# Altium PCB extension.PcbDoc (part 3 of 3)
Units mil, origin at the board's own origin, x right, y up, seen from the top; angles counter-clockwise.
Board outline 6141.73 x 4724.41 mil, 4 copper layers (Top Copper, Supply, GND, Bot Copper), stack 61.417 mil thick; 231 components, 147 nets, 660 pads, 234 vias.
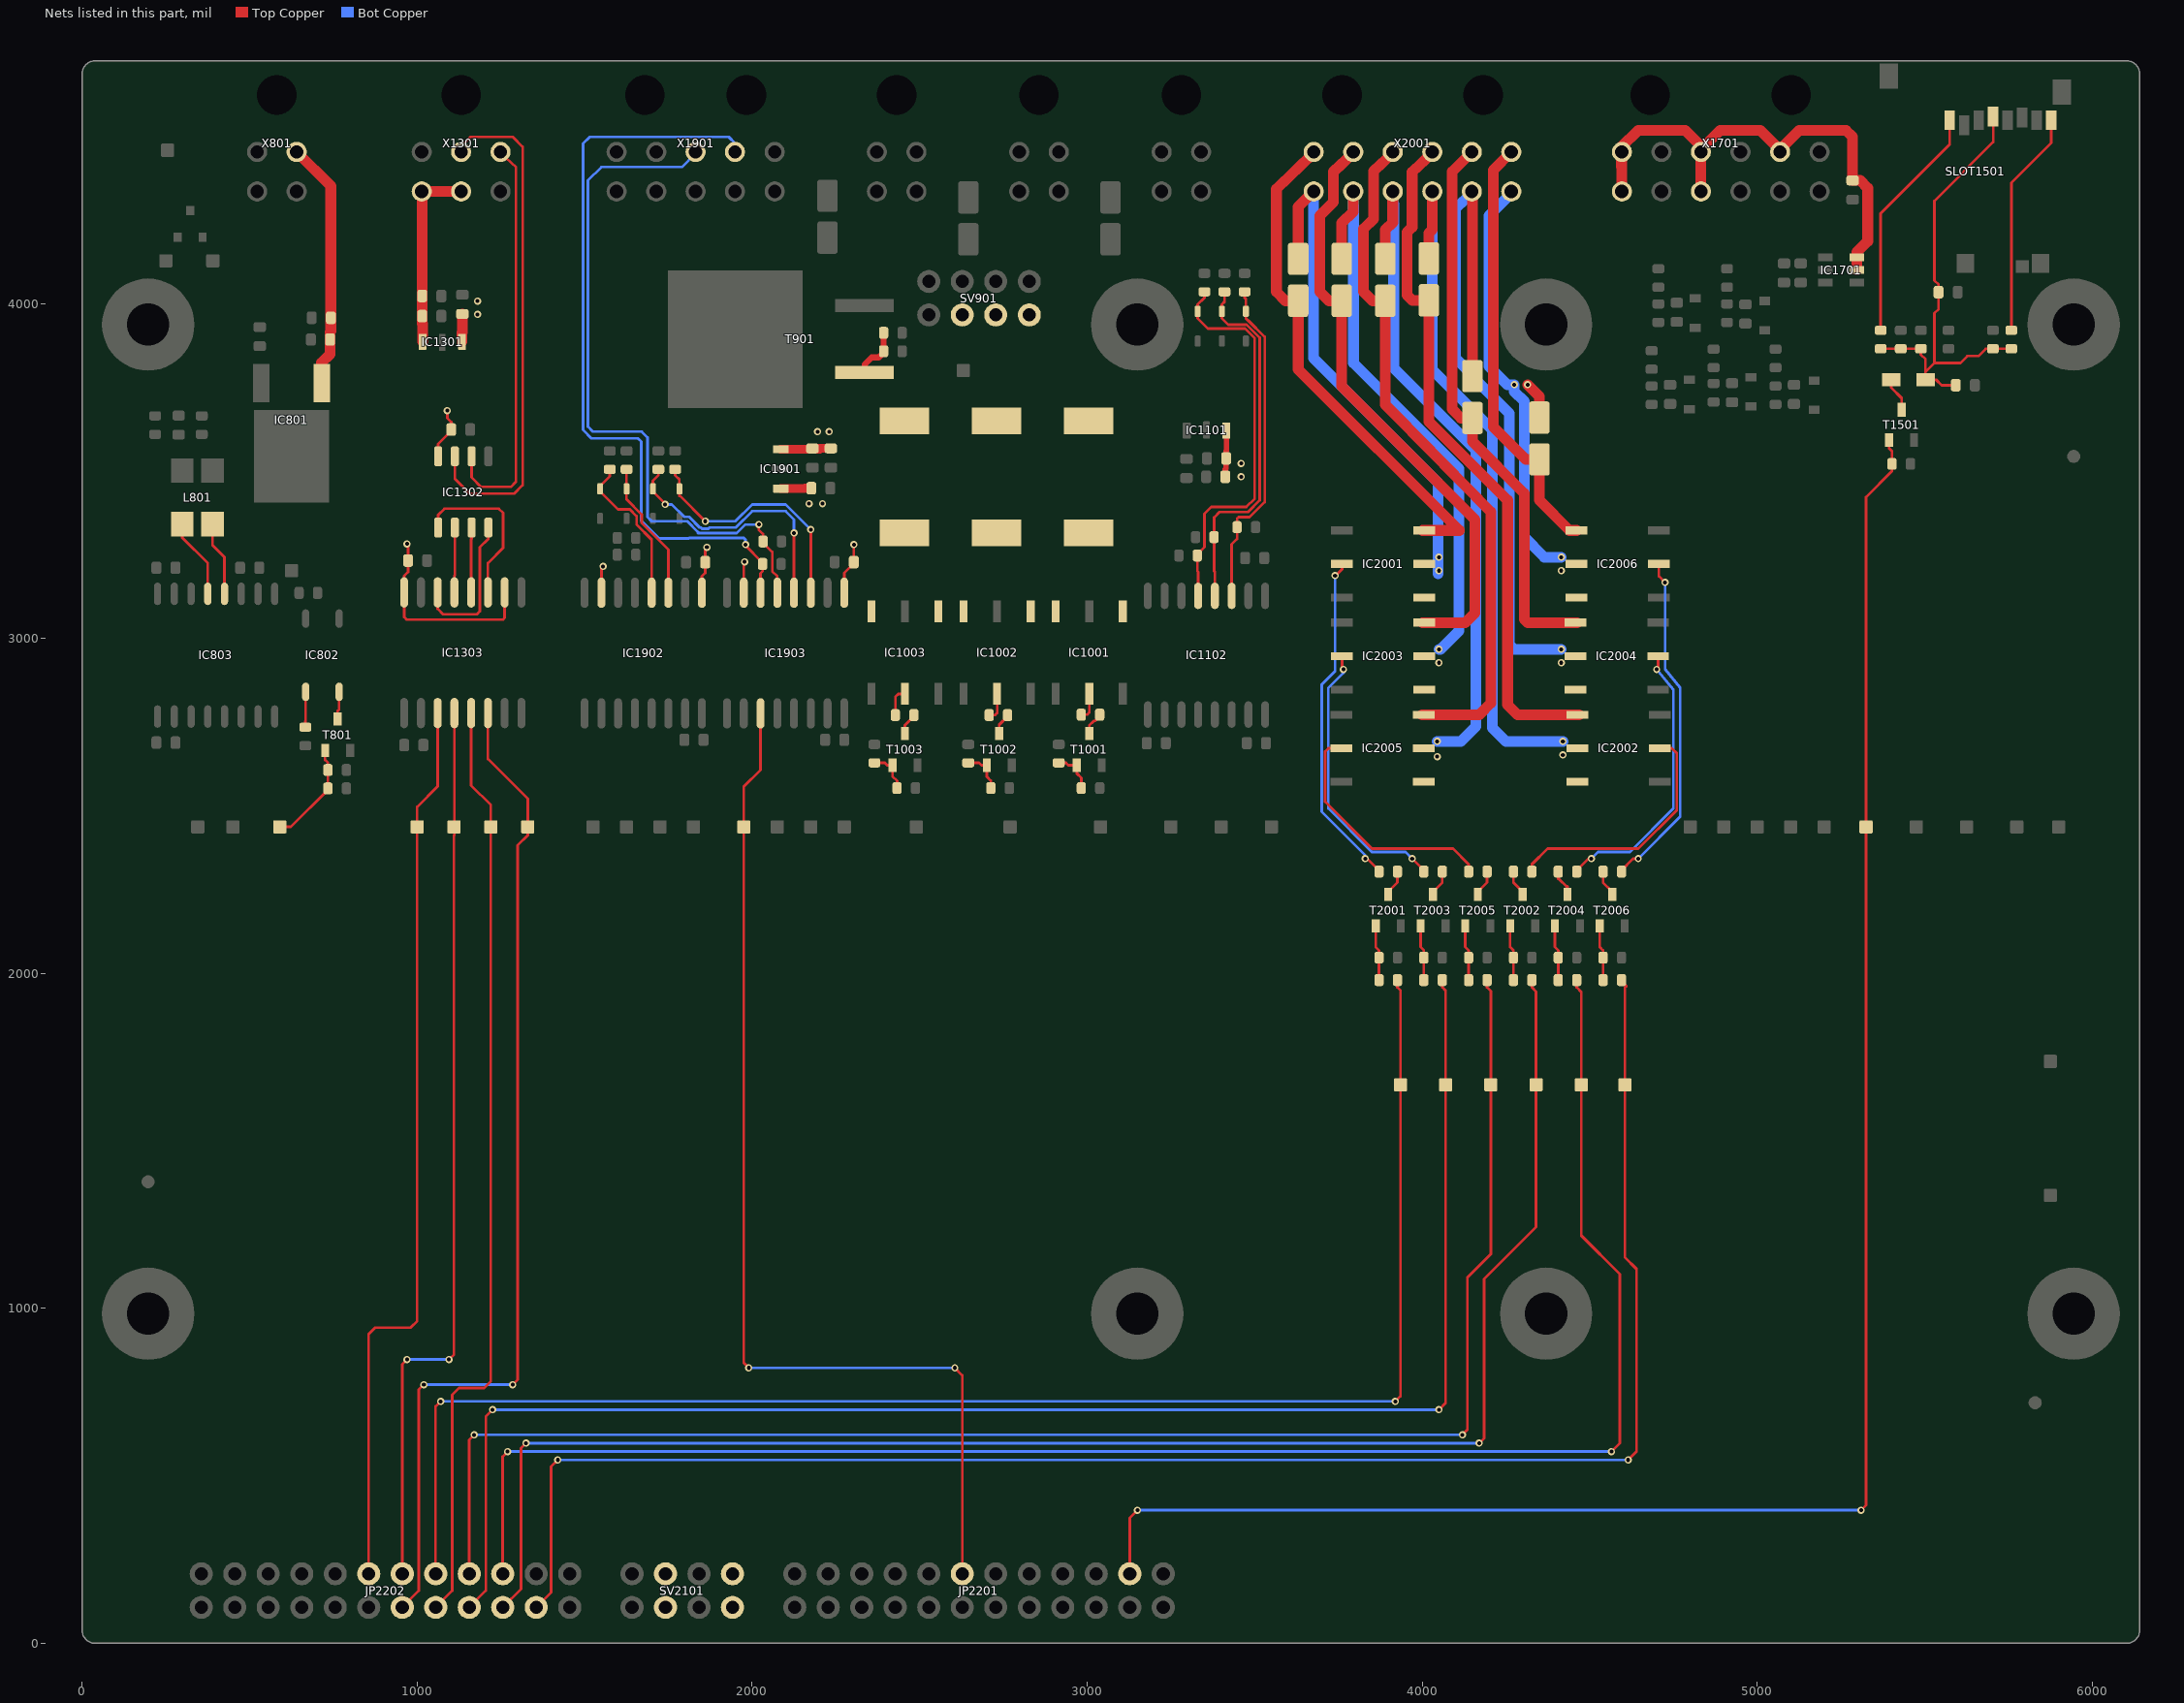
[diagram p5: the nets of this part, all layers, seen from the top]

## Via types
v1: diameter 21.65, hole 11.81, Top Copper to Bot Copper, tented both sides, 231 vias
v2: diameter 17.72, hole 8, Top Copper to Bot Copper, 2 vias
v3: diameter 35.43/70.86/70.86/35.43 (per signal layer), hole 23.62, Top Copper to Bot Copper, 1 vias

## Nets (pads, with @x,y where several pads share a name; then routed paths per layer and width w, separated by ;. In a path a pad name is that pad's centre, name@x,y a point inside that pad or via, vN(x,y) a via of type N, cw(c..) or ccw(c..) an arc to the next point about the centre after c; other vN are vias at no path point) (continued)
ISO_GPIO_MCU_0_OUT_2_EXT: IC1903.5 R1907.2 X1901.3 | length 2110.8
  Top Copper w8: v1(2020,3340) 2020,3323.65 2032.44,3311.21 R1907.2@2032.44,3289.5 2032.44,3285.56 2060,3258 2060,3200.54 2075,3185.54 IC1903.5@2075,3136.27
  Bot Copper w8: X1901.3@1831.26,4449.17 1831.26,4448.66 1790,4407.4 1550,4407.4 1510,4367.4 1510,3632.4 1525,3617.4 1670,3617.4 1687.5,3599.9 1687.5,3362.4 1700,3349.9 1806.25,3349.9 1838.22,3317.93 1838.22,3314.19 1954.19,3314.19 1980,3340 v1(2020,3340)
ISO_GPIO_MCU_0_OUT_3: IC1903.11 JP2201.14 LSP1908.1 | length 3221.4
  Top Copper w8: v1(1990,822.4) 1975,837.4 LSP1908.1@1975,2437.4 1975,2557.4 2025,2607.4 IC1903.11@2025,2776.03 ; IC1903.11@2025,2777.9 IC1903.11@2026.26,2776.64 ; v1(2605,822.4) 2627.17,800.23 JP2201.14@2627.17,207.48
  Bot Copper w8: v1(1990,822.4) v1(2605,822.4)
ISO_GPIO_MCU_0_OUT_3_EXT: IC1903.6 R1908.2 X1901.4 | length 2297.2
  Top Copper w8: v1(1980,3280) 1980,3277.52 2031.18,3226.34 R1908.2@2031.18,3222.4 2031.18,3200.68 2025,3194.5 IC1903.6@2025,3136.27
  Bot Copper w8: X1901.4@1949.37,4449.17 1949.37,4478.03 1930,4497.4 1515,4497.4 1495,4477.4 1495,3622.4 1520,3597.4 1658.75,3597.4 1668.75,3587.4 1668.75,3351.25 1721.68,3298.32 1810.71,3298.32 1812.28,3299.9 1975,3299.9 1980,3294.9 v1(1980,3280)
ISO_GPIO_SUPPLY: C1903.1 C1904.1 C1906.1 IC1901.1 IC1902.1 IC1902.7 IC1903.1 IC1903.7 | length 565.4
  Top Copper w8: IC1902.7@1550,3136.27 1550,3210 v1(1555,3215) ; IC1902.1@1850,3136.27 1850,3185.54 1859.8,3195.35 C1903.1@1859.8,3227.4 1859.8,3267.2 v1(1865,3272.4) ; IC1903.7@1975,3134.4 IC1903.7@1975,3136.27 1975,3226.15 v1(1977.5,3228.65) ; IC1903.1@2275,3136.27 2275,3195.52 2303.54,3224.06 C1906.1@2303.54,3228 v1(2303.54,3280)
  Top Copper w26: IC1901.1@2085.68,3447.09 2156.13,3447.09 2157.69,3448.66 C1904.1@2176.46,3448.66
  other v1: 2170,3402.4 2210,3402.4
ISONOC_0_CONTROL: JP2202.10 LSP2001.1 R2001.2 | length 4638.8
  Top Copper w8: JP2202.10@1055.51,207.48 1055,207.99 1055,707.4 v1(1070,722.4) ; v1(3920,722.4) 3935,737.4 LSP2001.1@3935,1667.4 3935,1949.58 3926.3,1958.28 R2001.2@3926.3,1980
  Bot Copper w8: v1(1070,722.4) v1(3920,722.4)
ISONOC_0_NEGATIVE: D2001.2 IC2001.5 X2001.7 | length 1521.5
  Top Copper w32: D2001.2@3630,4133.15 3630,4288.15 X2001.7@3676.26,4334.41
  Bot Copper w32: X2001.7@3675.98,4327.12 3675,4333.23 3675,3837.4 4046.85,3465.55 v1@4046.85,3192.4
  other v1: 4050,3202.4 4050,3242.4
ISONOC_0_POSITIVE: D2001.1 IC2001.4 IC2001.6 X2001.1 | length 1532.2
  Top Copper w32: X2001.1@3675.98,4449.17 3565,4341.34 3565,4035 3591.85,4008.15 D2001.1@3630,4008.15 3630,3804 4111.6,3322.4 IC2001.6@4006.77,3322.4 IC2001.6@4001.85,3322.4
ISONOC_1_CONTROL: JP2202.7 LSP2003.1 R2007.2 | length 4738.7
  Top Copper w8: JP2202.7@1155.51,107.48 1205,156.97 1205,677.4 v1(1225,697.4) ; v1(4050,697.4) 4070,717.4 LSP2003.1@4070,1667.4 4070,1948.33 4060.05,1958.28 R2007.2@4060.05,1980
  Bot Copper w8: v1(1225,697.4) v1(4050,697.4)
ISONOC_1_NEGATIVE: D2003.2 IC2003.5 X2001.8 | length 1733.8
  Top Copper w32: D2003.2@3760,4133.15 3760,4240 3794.25,4274.25 X2001.8@3794.25,4334.41
  Bot Copper w32: X2001.8@3794.09,4327.12 3794.09,4293.31 3795,4292.4 3795,3822.4 4110,3507.4 4110,3022.4 4055,2967.4 v1(4050,2967.4)
  other v1: 4050,2927.4
ISONOC_1_POSITIVE: D2003.1 IC2003.4 IC2003.6 X2001.2 | length 1796.2
  Top Copper w32: X2001.2@3794.09,4449.17 3735,4393.23 3735,4302.4 3695,4262.4 3695,4035 3721.85,4008.15 D2003.1@3760,4008.15 3760,3752.4 4157,3355.4 4157,3075.4 4129,3047.4 IC2003.6@4006.77,3047.4 IC2003.6@4001.85,3047.4
ISONOC_2_CONTROL: JP2202.8 LSP2005.1 R2013.2 | length 4768.8
  Top Copper w8: JP2202.8@1155.51,207.48 1155,207.99 1155,607.4 v1(1170,622.4) ; v1(4120,622.4) 4135,637.4 4135,1092.4 4205,1162.4 LSP2005.1@4205,1667.4 4205,1947.08 4193.8,1958.28 R2013.2@4193.8,1980
  Bot Copper w8: v1(1170,622.4) v1(4120,622.4)
ISONOC_2_NEGATIVE: D2005.2 IC2005.5 X2001.9 | length 2036.5
  Top Copper w32: D2005.2@3890,4133.15 3890,4220 3912.24,4242.24 X2001.9@3912.24,4334.41
  Bot Copper w32: X2001.9@3912.2,4327.12 3912.2,4300.2 3915,4297.4 3915,3807.4 4160,3562.4 4160,2737.4 4115,2692.4 v1(4045,2692.4)
  other v1: 4045,2647.4
ISONOC_2_POSITIVE: D2005.1 IC2005.4 IC2005.6 X2001.3 | length 2077.3
  Top Copper w32: X2001.3@3912.2,4449.17 3855,4395.12 3855,4252.4 3825,4222.4 3825,4035 3851.85,4008.15 D2005.1@3890,4008.15 3890,3697.4 3920,3667.4 4205,3377.4 4205,2807.4 4170,2772.4 IC2005.6@4004.29,2772.4 IC2005.6@3999.37,2772.4
ISONOC_3_CONTROL: JP2202.5 LSP2002.1 R2002.2 | length 4821.9
  Top Copper w8: JP2202.5@1255.51,107.48 1310,161.97 1310,582.4 v1(1325,597.4) ; v1(4170,597.4) 4185,612.4 4185,1087.4 4340,1242.4 LSP2002.1@4340,1667.4 4340,1945.83 4327.55,1958.28 R2002.2@4327.55,1980
  Bot Copper w8: v1(1325,597.4) v1(4170,597.4)
ISONOC_3_NEGATIVE: D2002.2 IC2002.5 X2001.10 | length 2100.2
  Top Copper w32: D2002.2@4020,4134.41 4020,4210 4030.28,4220.28 X2001.10@4030.28,4334.41
  Bot Copper w32: X2001.10@4030.32,4327.12 4030.32,4297.72 4030,4297.4 4030,3802.4 4210,3622.4 4210,2732.4 4250,2692.4 v1(4420,2692.4)
  other v1: 4420,2652.4
ISONOC_3_POSITIVE: D2002.1 IC2002.4 IC2002.6 X2001.4 | length 2057.7
  Top Copper w32: X2001.4@4030.32,4449.17 3970,4392.01 3970,4227.4 3955,4212.4 3955,4025 3970.59,4009.41 D2002.1@4020,4009.41 4020,3647.4 4255,3412.4 4255,2802.4 4285,2772.4 IC2002.4@4463.23,2772.4 IC2002.4@4468.15,2772.4
ISONOC_4_CONTROL: JP2202.6 LSP2004.1 R2008.2 | length 5137.6
  Top Copper w8: JP2202.6@1255.51,207.48 1255,207.99 1255,557.4 v1(1270,572.4) ; R2008.2@4461.3,1980 4461.3,1958.28 4475,1944.58 LSP2004.1@4475,1667.4 4475,1217.4 4590,1102.4 4590,597.4 v1(4565,572.4)
  Bot Copper w8: v1(1270,572.4) v1(4565,572.4)
ISONOC_4_NEGATIVE: D2004.2 IC2004.5 X2001.11 | length 2146.5
  Top Copper w32: X2001.11@4148.27,4334.41 4150,4332.68 D2004.2@4150,3783.15
  Bot Copper w32: X2001.11@4148.43,4327.12 4100,4285.79 4100,3837.4 4145,3792.4 4145,3787.4 4260,3672.4 4260,2982.4 4275,2967.4 v1(4415,2967.4)
  other v1: 4415,2927.4
ISONOC_4_POSITIVE: D2004.1 IC2004.4 IC2004.6 X2001.5 | length 1691.4
  Top Copper w32: X2001.5@4148.27,4452.4 4089,4393.13 4089,3684.64 4115.49,3658.15 D2004.1@4150,3658.15 ; D2004.1@4148.31,3657.99 4150,3640.43 4150,3587.4 4305,3432.4 4305,3057.4 4315,3047.4 IC2004.4@4458.23,3047.4 IC2004.4@4463.15,3047.4
ISONOC_5_CONTROL: JP2202.3 LSP2006.1 R2014.2 | length 5127.1
  Top Copper w8: JP2202.3@1355.51,107.48 1400,151.97 1400,527.4 v1(1420,547.4) ; R2014.2@4595.05,1980 4595.05,1976.06 4609.64,1961.47 4605,1956.83 LSP2006.1@4605,1667.4 4605,1152.4 4640,1117.4 4640,572.4 v1(4615,547.4)
  Bot Copper w8: v1(1420,547.4) v1(4615,547.4)
ISONOC_5_NEGATIVE: D2006.2 IC2006.5 X2001.12 | length 1339.8
  Top Copper w32: v1(4315,3757.4) 4350,3722.4 D2006.2@4350,3678.11
  Bot Copper w32: X2001.12@4266.54,4327.12 4266.54,4328.94 4200,4262.4 4200,3812.4 4255,3757.4 v1(4275,3757.4) 4275,3737.4 4305,3707.4 4305,3302.4 4365,3242.4 v1(4415,3242.4)
  other v1: 4415,3202.4
ISONOC_5_POSITIVE: D2006.1 IC2006.4 IC2006.6 X2001.6 | length 1291.3
  Top Copper w32: X2001.6@4266.26,4452.4 4212,4398.14 4212,3632 4309.59,3534.41 D2006.1@4350,3534.41 4350,3412.44 4440.04,3322.4 IC2006.4@4460.71,3322.4
MCU_TO_FPGA_INTERFACE_MCU_0_CS: SV2101.2
MCU_TO_FPGA_INTERFACE_MCU_0_MISO: SV2101.5
MCU_TO_FPGA_INTERFACE_MCU_0_MOSI: SV2101.1
MCU_TO_FPGA_INTERFACE_MCU_0_SCK: SV2101.6
Memorycard_SUPPLY: C1501.2 C1502.1 L1501.1 R1502.2 R1503.2 R1504.2 R1506.2 R1507.2 SLOT1501.4 | length 1418.5
  Top Copper w8: R1502.2@5368.74,3864.84 R1506.2@5428.74,3864.84 R1504.2@5488.74,3864.84 5488.74,3847.06 5502.44,3833.36 5502.44,3796.09 ; C1502.1@5592.91,3756 5550.4,3756 5534,3772.4 L1501.1@5502.44,3772.4 5502.44,3796.09 ; SLOT1501.4@5704.54,4558 5704.54,4481.54 5529,4306 5529,4068.82 5541.46,4056.36 C1501.2@5541.46,4033.66 5541.46,3983.46 5529,3971 5529,3822.64 ; R1503.2@5758.74,3864.84 R1507.2@5703.74,3864.84 5682.02,3864.84 5660.24,3843.06 5627.06,3843.06 5606.64,3822.64 5529,3822.64 ; 5502.44,3796.09 5529,3822.64
Memorycard_SUPPLY_CONTROL: JP2201.4 LSP1501.1 R1501.1 T1501.1 | length 5595.9
  Top Copper w8: JP2201.4@3127.17,207.48 3127.17,374.57 v1(3150,397.4) ; v1(5310,397.4) 5325,412.4 LSP1501.1@5325,2437.4 5325,3421.98 5402.44,3499.42 R1501.1@5402.44,3521.14 5402.44,3558.87 5393.86,3567.46 T1501.1@5393.86,3592.12
  Bot Copper w8: v1(3150,397.4) v1(5310,397.4)
NetC1301_1: C1301.1 C1302.1 IC1301.3 X1301.4 X1301.5 | length 567.2
  Top Copper w32: IC1301.3@1015.94,3885.58 1015.94,3938.95 1015.2,3939.7 C1301.1@1015.2,3962.4 C1302.1@1015.2,4022.4 1015.2,4332.99 X1301.4@1013.78,4334.41 X1301.5@1131.26,4334.41
NetC1303_1: C1303.1 C1304.1 C1305.1 IC1301.1 IC1302.8 IC1303.10 IC1303.16 | length 847
  Top Copper w8: v1(970,3282.4) 972.72,3279.68 C1305.1@972.72,3232.4 972.72,3198.26 961.25,3186.79 IC1303.16@961.25,3137.52 961.25,3063.65 968.75,3056.15 1256.25,3056.15 1261.25,3061.15 IC1303.10@1261.25,3137.52 ; IC1302.8@1062.5,3543.7 1062.5,3580.7 1101.46,3619.65 C1304.1@1101.46,3623.59 1101.46,3646.29 1090,3657.75 v1(1090,3680)
  Top Copper w32: IC1301.1@1134.06,3885.58 1134.06,3913.2 1135,3914.15 C1303.1@1135,3968.86
  other v1: 1180,3967.4 1180,4007.4
NetC1707_1: C1707.1 IC1701.5 IC1701.6 X1701.1 X1701.3 X1701.5 X1701.7 X1701.9 | length 1627.7
  Top Copper w24: C1707.1@5285,4369.66 C1707.1@5286.01,4368.65
  Top Copper w32: X1701.7@4595.98,4327.12 4595.98,4449.17 4595,4408.03 4595,4467.4 4645,4517.4 4785,4517.4 4835,4467.4 X1701.3@4835,4462.4 ; X1701.9@4832.2,4327.12 4832.2,4459.6 X1701.3@4835,4462.4 ; X1701.5@5068.43,4449.17 5068.43,4460.83 X1701.5@5070,4462.4 ; C1707.1@5285,4367.2 5307.7,4367.2 5330,4344.9 5330,4185.72 5297.49,4153.21 IC1701.6@5297.49,4137.4 IC1701.5@5297.49,4100 ; C1707.1@5285,4369.66 5285,4497.4 5265,4517.4 5125,4517.4 X1701.5@5070,4462.4 ; X1701.3@4835,4462.4 4890,4517.4 5010,4517.4 5065,4462.4 X1701.5@5070,4462.4
NetD1101_1: D1101.1 IC1102.3 R1101.1 R1104.1 | length 992.9
  Top Copper w8: IC1102.3@3431.25,3127.07 3431.25,3281.25 3447.44,3297.44 R1104.1@3447.44,3332.4 3447.44,3357.44 3452.4,3362.4 3485,3362.4 3530,3407.4 3530,3900.09 3481.09,3949 3480.69,3949 3473.82,3955.87 D1101.1@3473.82,3976.6 3473.82,4013.25 3470,4017.06 R1101.1@3470,4034.84
NetD1102_1: D1102.1 IC1102.4 R1102.1 R1105.1 | length 1097.6
  Top Copper w8: IC1102.4@3381.25,3127.07 3381.25,3198.75 3378.82,3201.18 R1105.1@3378.82,3302.4 3378.82,3361.22 3395,3377.4 3480,3377.4 3515,3412.4 3515,3898.12 3476.12,3937 3420.78,3937 3401.91,3955.87 D1102.1@3401.91,3976.6 3401.91,3997.34 3410,4005.43 R1102.1@3410,4034.84
NetD1103_1: D1103.1 IC1102.5 R1103.1 R1106.1 | length 1184.7
  Top Copper w8: IC1102.5@3331.25,3127.07 3331.25,3198.75 3328.82,3201.18 R1106.1@3328.82,3247.4 3328.82,3251.34 3350,3272.52 3350,3372.4 3370,3392.4 3475,3392.4 3500,3417.4 3500,3896.15 3471.15,3925 3360.56,3925 3330,3955.56 D1103.1@3330,3976.29 3330,3997.02 3350,4017.02 R1103.1@3350,4034.84
NetD1901_1: D1901.1 IC1902.3 R1901.1 | length 420.3
  Top Copper w8: R1901.1@1625,3504.84 D1901.1@1625,3446.6 1625,3415 1670,3370 1670,3345 1750,3265 IC1902.3@1750,3136.27
NetD1902_1: D1902.1 IC1902.4 R1902.1 | length 464.9
  Top Copper w8: R1902.1@1575,3504.84 1575,3483.38 1546.09,3454.48 D1902.1@1546.09,3446.6 1546.09,3438.73 1599.82,3385 1635,3385 1655,3365 1655,3340 1700,3295 IC1902.4@1700,3136.27
NetD1903_1: D1903.1 IC1903.3 R1905.1 | length 748.4
  Top Copper w8: R1905.1@1770,3504.84 1770,3487.06 1782.82,3474.25 D1903.1@1782.82,3446.6 1782.82,3425.87 1784.13,3425.87 v1(1860,3350) ; IC1903.3@2175,3136.27 v1(2175,3325)
  Bot Copper w8: v1(1860,3350) 1950,3350 2000,3400 2100,3400 v1(2175,3325)
NetD1904_1: D1904.1 IC1903.4 R1906.1 | length 792.6
  Top Copper w8: R1906.1@1720,3504.84 1720,3487.06 1703.91,3470.97 D1904.1@1703.91,3446.6 1703.91,3438.73 1740,3402.64 v1(1740,3400) ; IC1903.4@2125,3136.27 v1(2125,3315)
  Bot Copper w8: v1(1740,3400) 1760,3400 1797.18,3362.82 1811.6,3362.82 1843.19,3331.24 1846.48,3331.24 1850.54,3327.17 1869.46,3327.17 1873.52,3331.24 1951.24,3331.24 2000,3380 2100,3380 2125,3355 v1(2125,3315)
NetF1001_1: F1001.1 IC1001.4 IC1001.6
NetF1002_1: F1002.1 IC1002.4 IC1002.6
NetF1003_1: F1003.1 IC1003.4 IC1003.6
NetIC802_1: IC802.1 R804.2 | length 106
  Top Copper w8: R804.2@666.26,2734.96 666.26,2752.74 667.1,2753.57 IC802.1@667.1,2840.65
NetIC802_2: IC802.2 T801.D | length 95.3
  Top Copper w8: T801.D@762.5,2747.24 T801.D@762.5,2759.64 762.5,2783.33 767.1,2787.93 IC802.2@767.1,2840.65
NetIC803_12: IC803.12 L801.2 | length 223
  Top Copper w8: L801.2@389.28,3341.28 389.28,3278.72 425,3243 IC803.12@425,3133.07
NetIC803_13: IC803.13 L801.3 | length 239.8
  Top Copper w8: L801.3@298.72,3341.28 298.72,3300.86 375,3224.58 IC803.13@375,3133.07
NetIC1001_2: IC1001.2 R1003.2 | length 90.5
  Top Copper w8: R1003.2@2979,2772.4 R1003.2@2982.44,2772.4 3000,2772.4 3006.26,2778.66 IC1001.2@3006.26,2834.37 IC1001.2@3006.26,2839.29
NetIC1002_2: IC1002.2 R1006.2 | length 83.5
  Top Copper w8: R1006.2@2707.44,2771.14 2725.22,2771.14 2731.26,2777.18 IC1002.2@2731.26,2834.37
NetIC1003_2: IC1003.2 R1009.2 | length 86.8
  Top Copper w8: R1009.2@2427.44,2771.14 2427.44,2825.44 2436.37,2834.37 IC1003.2@2456.26,2834.37
NetIC1302_1: IC1302.1 IC1303.11 | length 494
  Top Copper w8: IC1302.1@1062.5,3337.4 1062.5,3368.65 1081.25,3387.4 1243.75,3387.4 1256.25,3374.9 1256.25,3270.25 1211.25,3225.25 IC1303.11@1211.25,3137.52
NetIC1302_2: IC1302.2 IC1303.13 | length 194.1
  Top Copper w8: IC1303.13@1111.25,3137.52 1111.25,3186.79 1112.5,3188.04 IC1302.2@1112.5,3331.1
NetIC1302_3: IC1302.3 IC1303.12 | length 194.1
  Top Copper w8: IC1303.12@1161.25,3137.52 1161.25,3296.32 1162.5,3297.57 IC1302.3@1162.5,3331.1
NetIC1302_4: IC1302.4 IC1303.14 | length 446.1
  Top Copper w8: IC1303.14@1061.25,3137.52 1061.25,3088.24 1077.49,3072 1178,3072 1187,3081 1187,3272.07 1212.5,3297.57 IC1302.4@1212.5,3331.1
NetIC2001_2: IC2001.2 R2005.2 | length 1009.3
  Top Copper w8: v1(3740,3187.4) 3741.52,3187.4 3760.71,3206.59 IC2001.2@3760.71,3222.4 ; v1(3830,2342.4) 3836.69,2342.4 3871.18,2307.91 R2005.2@3871.18,2303.97
  Bot Copper w8: v1(3740,3187.4) 3740,2902.4 3700,2862.4 3700,2482.4 v1@3830,2352.4
NetIC2002_2: IC2002.2 R2006.2 | length 753
  Top Copper w8: R2006.2@4327.55,2303.97 4327.55,2325.69 4374.26,2372.4 4645,2372.4 4760,2487.4 4760,2657.4 4745,2672.4 IC2002.2@4709.29,2672.4 IC2002.2@4704.37,2672.4
NetIC2003_2: IC2003.2 R2011.2 | length 840.7
  Top Copper w8: IC2003.2@3760.71,2947.4 3760.71,2911.69 v1(3765,2907.4) ; v1(3970,2342.4) 3970.44,2342.4 4004.93,2307.91 R2011.2@4004.93,2303.97
  Bot Copper w8: v1(3765,2907.4) 3765,2897.4 3720,2852.4 3720,2492.4 3850,2362.4 3950,2362.4 v1(3970,2342.4)
NetIC2004_2: IC2004.2 R2012.2 | length 843.9
  Top Copper w8: R2012.2@4461.3,2303.97 4461.3,2307.91 4495.79,2342.4 v1(4505,2342.4) ; v1(4700,2907.4) 4704.29,2911.69 IC2004.2@4704.29,2947.4
  Bot Copper w8: v1(4505,2342.4) 4525,2362.4 4620,2362.4 4750,2492.4 4750,2847.4 v1(4700,2907.4)
NetIC2005_2: IC2005.2 R2017.2 | length 735
  Top Copper w8: IC2005.2@3763.15,2672.4 IC2005.2@3758.23,2672.4 3720,2672.4 3710,2662.4 3710,2512.4 3850,2372.4 4091.97,2372.4 4138.68,2325.69 R2017.2@4138.68,2303.97
NetIC2006_2: IC2006.2 R2018.2 | length 1026.2
  Top Copper w8: R2018.2@4595.05,2303.97 4595.05,2307.91 4629.54,2342.4 v1(4645,2342.4) ; IC2006.2@4706.77,3222.4 4706.77,3185.63 v1(4725,3167.4)
  Bot Copper w8: v1@4647.6,2342.4 v1(4645,2342.4) 4770,2467.4 4770,2852.4 4725,2907.4 v1(4725,3167.4)
NetL1501_2: L1501.2 T1501.3 | length 102.6
  Top Copper w8: L1501.2@5400.08,3772.4 5400.08,3748.72 5431.26,3717.53 T1501.3@5431.26,3682.68
NetLSP807_1: LSP807.1 R805.1 R806.1 T801.G | length 310
  Top Copper w8: LSP807.1@590,2437.4 622.64,2437.4 733.7,2548.46 R806.1@733.7,2552.4 R805.1@733.7,2607.4 733.7,2629.12 725.1,2637.72 T801.G@725.1,2665.16
NetR901_1: R901.1 R902.1 T901.1 | length 154.5
  Top Copper w18: T901.1@2335.53,3793.65 2335.53,3817.34 2357.07,3838.87 2377.85,3838.87 2392.44,3853.46 R902.1@2392.44,3857.4 R901.1@2392.44,3912.4
NetR1001_1: R1001.1 R1002.2 T1001.G | length 130.5
  Top Copper w8: R1002.2@2915,2628.58 2936.72,2628.58 2943.89,2621.41 T1001.G@2968.85,2621.41 2968.85,2597.72 2982.44,2584.13 R1001.1@2982.44,2553.33
NetR1003_1: R1003.1 T1001.D | length 70.9
  Top Copper w8: T1001.D@3006.25,2715.89 3006.25,2739.58 3020.54,2753.87 3022.97,2753.87 3037.56,2768.46 R1003.1@3037.56,2772.4
NetR1004_1: R1004.1 R1005.2 T1002.G | length 131.3
  Top Copper w8: R1005.2@2645,2628.58 2677.11,2628.58 2684.29,2621.41 T1002.G@2700.1,2621.41 2700.1,2587.38 2712.44,2575.04 R1004.1@2712.44,2553.33
NetR1006_1: R1006.1 T1002.D | length 65.6
  Top Copper w8: T1002.D@2737.5,2715.89 2737.5,2742.14 2762.56,2767.2 R1006.1@2762.56,2771.14
NetR1007_1: R1007.1 R1008.2 T1003.G | length 130.5
  Top Copper w8: R1008.2@2365,2628.58 2395.86,2628.58 2403.04,2621.41 T1003.G@2418.85,2621.41 2418.85,2588.63 2432.44,2575.04 R1007.1@2432.44,2553.33
NetR1009_1: R1009.1 T1003.D | length 66.1
  Top Copper w8: T1003.D@2456.25,2715.89 2456.25,2740.89 2482.56,2767.2 R1009.1@2482.56,2771.14
NetR1502_1: R1502.1 SLOT1501.1 | length 709.1
  Top Copper w8: R1502.1@5368.74,3923.4 5368.74,4268.74 5574.62,4474.62 SLOT1501.1@5574.62,4547.17
NetR1503_1: R1503.1 SLOT1501.8 | length 673.1
  Top Copper w8: R1503.1@5758.74,3923.4 5758.74,4360.6 5877.77,4479.63 SLOT1501.8@5877.77,4547.17
NetR2001_1: R2001.1 R2003.2 T2001.G | length 165.5
  Top Copper w8: T2001.G@3861.34,2141.41 3861.34,2078.66 3871.18,2068.81 R2003.2@3871.18,2047.1 3871.18,2001.72 R2001.1@3871.18,1980
NetR2002_1: R2002.1 R2004.2 T2002.G | length 165.5
  Top Copper w8: T2002.G@4262.59,2141.41 4262.59,2078.66 4272.43,2068.81 R2004.2@4272.43,2047.1 4272.43,2025.38 R2002.1@4272.43,1980
NetR2005_1: R2005.1 T2001.D | length 79.5
  Top Copper w8: T2001.D@3898.74,2235.89 3898.74,2243.77 3926.3,2271.33 R2005.1@3926.3,2303.97
NetR2006_1: R2006.1 T2002.D | length 79.5
  Top Copper w8: R2006.1@4272.43,2303.97 4272.43,2271.33 4299.99,2243.77 T2002.D@4299.99,2235.89
NetR2007_1: R2007.1 R2009.2 T2003.G | length 165.5
  Top Copper w8: T2003.G@3995.09,2141.41 3995.09,2078.66 4004.93,2068.81 R2009.2@4004.93,2047.1 4004.93,2025.38 R2007.1@4004.93,1980
NetR2008_1: R2008.1 R2010.2 T2004.G | length 165.5
  Top Copper w8: T2004.G@4396.34,2141.41 4396.34,2078.66 4406.18,2068.81 R2010.2@4406.18,2047.1 4406.18,2001.72 R2008.1@4406.18,1980
NetR2011_1: R2011.1 T2003.D | length 79.5
  Top Copper w8: T2003.D@4032.49,2235.89 4032.49,2243.77 4060.05,2271.33 R2011.1@4060.05,2303.97
NetR2012_1: R2012.1 T2004.D | length 82.4
  Top Copper w8: R2012.1@4406.18,2303.97 4406.18,2282.26 4407.74,2282.26 4430.42,2259.58 4433.74,2259.58 T2004.D@4433.74,2235.89
NetR2013_1: R2013.1 R2015.2 T2005.G | length 165.5
  Top Copper w8: T2005.G@4128.84,2141.41 4128.84,2078.66 4138.68,2068.81 R2015.2@4138.68,2047.1 4138.68,2025.38 R2013.1@4138.68,1980
NetR2014_1: R2014.1 R2016.2 T2006.G | length 165.5
  Top Copper w8: T2006.G@4530.09,2141.41 4530.09,2078.66 4539.93,2068.81 R2016.2@4539.93,2047.1 4539.93,2001.72 R2014.1@4539.93,1980
NetR2017_1: R2017.1 T2005.D | length 79.5
  Top Copper w8: T2005.D@4166.24,2235.89 4166.24,2243.77 4193.8,2271.33 R2017.1@4193.8,2303.97
NetR2018_1: R2018.1 T2006.D | length 79.5
  Top Copper w8: R2018.1@4539.93,2303.97 4539.93,2271.33 4567.49,2243.77 T2006.D@4567.49,2235.89
RS485_A_EXT: IC1302.6 X1301.3 | length 1215.2
  Top Copper w8: IC1302.6@1162.5,3543.7 1162.5,3480.5 1190.6,3452.4 1280,3452.4 1295,3467.4 1295,4406.69 X1301.3@1249.37,4449.17
RS485_B_EXT: IC1302.7 X1301.2 | length 1535.9
  Top Copper w8: IC1302.7@1112.5,3543.7 1112.5,3476.5 1156.6,3432.4 1290,3432.4 1315,3457.4 1315,4467.4 1285,4497.4 1160,4497.4 1131.26,4468.66 X1301.2@1131.26,4452.4 X1301.2@1131.26,4449.17
RS485_MCU_0_DE: IC1303.5 JP2202.9 LSP1302.1 | length 2808.1
  Top Copper w8: JP2202.9@1055.51,107.48 1105,156.97 1105,742.4 1125,762.4 1200,762.4 1220,782.4 LSP1302.1@1220,2437.4 1220,2502.4 1161.26,2561.14 IC1303.5@1161.26,2779.14
RS485_MCU_0_NRE: IC1303.4 JP2202.12 LSP1303.1 | length 2709.4
  Top Copper w8: JP2202.12@955.51,207.48 955.51,832.91 v1(970,847.4) ; v1(1095,847.4) 1110,862.4 1110,2412.4 1111.26,2413.66 IC1303.4@1111.26,2779.14
  Bot Copper w8: v1(970,847.4) v1(1095,847.4)
RS485_MCU_0_RX: IC1303.6 JP2202.11 LSP1304.1 | length 3029.3
  Top Copper w8: JP2202.11@955.51,107.48 1005,156.97 1005,757.4 v1(1020,772.4) ; IC1303.6@1211.25,2777.28 1211.25,2640.25 1330,2521.5 LSP1304.1@1330,2437.4 1330,2412.4 1300,2382.4 1300,787.4 v1(1285,772.4)
  Bot Copper w8: v1(1020,772.4) v1(1285,772.4)
RS485_MCU_0_TX: IC1303.3 JP2202.14 LSP1301.1 | length 2717
  Top Copper w8: JP2202.14@855.51,207.48 855,207.99 855,922.4 875,942.4 980,942.4 1000,962.4 LSP1301.1@1000,2437.4 1000,2497.4 1061.25,2558.65 IC1303.3@1061.25,2777.28
SUPPLY_EXT_0: C1101.1 C1102.1 C1901.1 C1902.1 IC1101.3 IC1901.3 SV901.5 | length 312.2
  Top Copper w16: C1101.1@3412.28,3482.4 3412.28,3505.1 3414.8,3507.62 C1102.1@3414.8,3537.4 3414.8,3560.1 3415.31,3560.6 IC1101.3@3415.31,3620.47
  Top Copper w26: IC1901.3@2085.68,3565.21 2200.7,3565.21 2202.7,3567.2 ; C1902.1@2180,3567.2 2202.7,3567.2 ; C1901.1@2235,3567.2 2202.7,3567.2
  other v1: 3460,3482.4 3460,3522.4 2195,3617.4 2230,3617.4
SUPPLY_EXT_1: C801.2 C802.2 IC801.1 X801.2 | length 744
  Top Copper w32: X801.2@640.28,4452.4 742.28,4350.39 C801.2@742.28,3957.4 742.28,3917.58 739.8,3915.1 C802.2@739.8,3892.4 739.8,3848.13 714.76,3823.09 IC801.1@714.76,3762.01
SUPPLY_EXT_2: F1001.2 F1002.2 F1003.2 SV901.1 SV901.3
pads on no net: Designator30.Hole_3.2 Designator31.Hole_3.2 Designator32.Hole_3.2 Designator33.Hole_3.2 Designator34.Hole_3.2 Designator35.Hole_3.2 Designator36.Hole_3.2 Designator37.Hole_3.2 FD1.0 FD2.0 FD3.0 IC803.4 IC803.6 IC1001.3 IC1002.3 IC1003.3 IC1102.6 IC1102.7 IC1102.11 IC2001.3 IC2002.3 IC2003.3 IC2004.3 IC2005.3 IC2006.3 JP2201.2 JP2201.18 JP2202.2 X801. X1201. X1202. X1203. X1301. X1701. X1901. X2001.

## Polygon pours and split planes (outlines as drawn)
no net on Top Overlay "Label_Field" (solid, pour order 146): 3426.1,268.9 3426.1,33.44 4446.5,33.44 4446.5,268.9
GND_0 on GND "Polygon_1_Net_GND_0" (solid, remove dead copper, pour order 134): -4,-4 -4,2871.4 3678.34,2871.4 3726,2919.06 3726,3329.06 3738.34,3341.4 3791.66,3341.4 3804,3329.06 3804,2444.06 3856.66,2391.4 4618.34,2391.4 4666.01,2439.06 4670.99,4065.64 4556,4170.64 4556,4703.95 4578.23,4728.41 6145.73,4728.41 6145.73,-4
GND_EXT_0 on GND "Polygon_1_Net_GND_EXT_0" (solid, remove dead copper, pour order 133): 1486,4728.41 1486,3050.74 1503.34,3033.4 3563.95,3033.4 3568.98,3445.82 3626.75,3508.4 3903.34,3508.4 3966,3445.74 3966,2565.74 3978.34,2553.4 4486.66,2553.4 4499.01,2565.75 4493.99,4009.19 4394,4099.18 4394,4728.41
GND_EXT_1 on GND "Polygon_1_Net_GND_EXT_1" (solid, remove dead copper, pour order 132): -4,4728.41 784,4728.41 784,3050.74 766.66,3033.4 -4,3033.4
GND_EXT_3 on GND "Polygon_1_Net_GND_EXT_3" (solid, remove dead copper, pour order 131): 946,4728.41 1324,4728.41 1324,3050.74 1306.66,3033.4 963.34,3033.4 946,3050.74
+3.3V_0 on Supply "Polygon_1_Net_+3.3V_0" (solid, remove dead copper, pour order 130): -4,-4 -4,2871.4 3678.34,2871.4 3726,2919.06 3726,3329.06 3738.34,3341.4 3791.66,3341.4 3804,3329.06 3804,2444.06 3856.66,2391.4 4618.34,2391.4 4666.01,2439.06 4670.99,4065.64 4556,4170.64 4556,4703.95 4578.23,4728.41 6145.73,4728.41 6145.73,-4
SUPPLY_EXT_0 on Supply "Polygon_2_Net_SUPPLY_EXT_0" (solid, remove dead copper, pour order 129): 1486,4728.41 1486,3050.74 1503.34,3033.4 3563.95,3033.4 3568.98,3445.82 3626.75,3508.4 3903.34,3508.4 3966,3445.74 3966,2565.74 3978.34,2553.4 4486.66,2553.4 4499.01,2565.75 4493.99,4009.19 4394,4099.18 4394,4728.41
CAN_TRANS_1_EXT_SUPPLY on Supply "Polygon_1_Net_CAN_TRANS_1_EXT_SUPPLY" (solid, remove dead copper, pour order 128): -4,4728.41 784,4728.41 784,3050.74 766.66,3033.4 -4,3033.4
NetC1303_1 on Supply "Polygon_1_Net_N$279" (solid, remove dead copper, pour order 127): 946,4728.41 1324,4728.41 1324,3050.74 1306.66,3033.4 963.34,3033.4 946,3050.74
ISO_GPIO_SUPPLY on Supply "Polygon_2_Net_ISO_GPIO_SUPPLY" (solid, remove dead copper, pour order 126): 1486,3574.06 1486,3050.74 1503.34,3033.4 2301.66,3033.4 2319,3050.74 2319,3569.06 2296.66,3591.4 1503.34,3591.4
CONTACTOR_FEEDBACK_SUPPLY_EXT on Supply "Polygon_2_Net_CONTACTOR_FEEDBACK_SUPPLY_EXT" (solid, remove dead copper, pour order 125): 3156,3594.06 3156,3055.74 3178.34,3033.4 3536.66,3033.4 3563.98,3060.72 3569.02,3424.03 3546.66,3446.4 3446.66,3446.4 3424,3469.06 3424,3589.06 3401.69,3611.36 3178.38,3616.44
CONTACTORS_COMMON_NEG on Top Copper "Polygon_1_Net_CONTACTORS_COMMON_NEG" (solid, remove dead copper, pour order 124): 1583.34,3658.4 1561,3680.74 1561,4244.06 1583.34,4266.4 2098.34,4266.4 2121,4289.06 2121,4369.06 2143.34,4391.4 3481.66,4391.4 3504,4369.06 3504,4180.74 3481.66,4158.4 3351.84,4158.4 3321.84,4123.4 2426.66,4123.4 2404,4100.74 2404,3685.74 2376.66,3658.4
GND_EXT_1 on Top Copper "Polygon_2_Net_GND_EXT_1" (solid, remove dead copper, pour order 123): 473.34,4091.4 756.66,4091.4 784,4064.06 784,3305.74 761.66,3283.4 473.34,3283.4 446,3310.74 446,4064.06
GND_EXT_0 on Top Copper "Polygon_2_Net_GND_EXT_0" (solid, remove dead copper, pour order 121): 1816,3619.06 1816,3400.74 1838.34,3378.4 2291.66,3378.4 2319,3405.74 2319,3614.06 2291.66,3641.4 1838.34,3641.4
GND_EXT_0 on Top Copper "Polygon_3_Net_GND_EXT_0" (solid, remove dead copper, pour order 120): 3466.66,3916.4 3323.34,3916.4 3306,3899.06 3306,3869.06 3221,3784.06 3221,3425.74 3243.34,3403.4 3461.66,3403.4 3484,3425.74 3484,3899.06
GND_EXT_3 on Top Copper "Polygon_2_Net_GND_EXT_3" (solid, remove dead copper, pour order 119): 1251.66,3708.4 973.34,3708.4 946,3735.74 946,4064.06 973.34,4091.4 1251.66,4091.4 1279,4064.06 1279,3735.74
NetF1003_1 on Top Copper "Polygon_1_Net_N$21" (solid, remove dead copper, pour order 116): 2331,3050.74 2331,3359.06 2348.34,3376.4 2566.66,3376.4 2584,3359.06 2584,3050.74 2566.66,3033.4 2348.34,3033.4
NetF1002_1 on Top Copper "Polygon_1_Net_N$19" (solid, remove dead copper, pour order 115): 2606,3050.74 2606,3359.06 2623.34,3376.4 2841.66,3376.4 2859,3359.06 2859,3050.74 2841.66,3033.4 2623.34,3033.4
NetF1001_1 on Top Copper "Polygon_1_Net_N$18" (solid, remove dead copper, pour order 117): 2881,3050.74 2881,3359.06 2898.34,3376.4 3116.66,3376.4 3134,3359.06 3134,3050.74 3116.66,3033.4 2898.34,3033.4
ISONOC_3_POSITIVE on Top Copper "Polygon_1_Net_ISONOC_3_POSITIVE" (solid, remove dead copper, pour order 114): 4253.34,2553.4 4486.66,2553.4 4499,2565.74 4499,2774.06 4481.62,2791.44 4253.31,2786.36 4241,2774.06 4241,2565.74
ISONOC_2_POSITIVE on Top Copper "Polygon_1_Net_ISONOC_2_POSITIVE" (solid, remove dead copper, pour order 113): 4206.66,2791.4 3983.34,2791.4 3966,2774.06 3966,2565.74 3978.34,2553.4 4206.66,2553.4 4219,2565.74 4219,2779.06
ISONOC_4_POSITIVE on Top Copper "Polygon_1_Net_ISONOC_4_POSITIVE" (solid, remove dead copper, pour order 112): 4486.66,3066.4 4303.34,3066.4 4286,3049.06 4286,2845.74 4303.34,2828.4 4486.66,2828.4 4499,2840.74 4499,3054.06
ISONOC_1_POSITIVE on Top Copper "Polygon_1_Net_ISONOC_1_POSITIVE" (solid, remove dead copper, pour order 111): 3978.34,2828.4 4156.66,2828.4 4174,2845.74 4174,3049.06 4156.66,3066.4 3978.34,3066.4 3966,3054.06 3966,2840.74
ISONOC_0_POSITIVE on Top Copper "Polygon_1_Net_ISONOC_0_POSITIVE" (solid, remove dead copper, pour order 110): 3978.34,3103.4 4111.66,3103.4 4129,3120.74 4129,3324.06 4111.66,3341.4 3978.34,3341.4 3966,3329.06 3966,3115.74
ISONOC_5_POSITIVE on Top Copper "Polygon_1_Net_ISONOC_5_POSITIVE" (solid, remove dead copper, pour order 109): 4353.34,3103.4 4481.66,3103.4 4499,3120.74 4499,3324.06 4481.66,3341.4 4353.34,3341.4 4336,3324.06 4336,3120.74
GND_EXT_2 on Top Copper "Polygon_3_Net_GND_EXT_2" (solid, remove dead copper, pour order 118): 2221,4089.06 2221,3910.74 2248.34,3883.4 2661.66,3883.4 2679,3900.74 2679,3995.74 2701.66,4018.4 2851.66,4018.4 2879,4045.74 2879,4089.06 2851.66,4116.4 2248.34,4116.4
ISONOC_4_NEGATIVE on Top Copper "Polygon_1_Net_ISONOC_4_NEGATIVE" (solid, remove dead copper, pour order 104): 4494,2910.74 4481.66,2898.4 4398.34,2898.4 4386,2910.74 4386,2984.06 4398.34,2996.4 4481.66,2996.4 4494,2984.06
CONTACTOR_7_COIL_POS on Top Copper "Polygon_1_Net_CONTACTOR_7_COIL_POS" (solid, remove dead copper, pour order 106): 2681,3045.74 2681,3164.06 2693.34,3176.4 2766.66,3176.4 2779,3164.06 2779,3045.74 2766.66,3033.4 2693.34,3033.4
CONTACTOR_6_COIL_POS on Top Copper "Polygon_1_Net_CONTACTOR_6_COIL_POS" (solid, remove dead copper, pour order 108): 2956,3045.74 2956,3164.06 2968.34,3176.4 3041.66,3176.4 3054,3164.06 3054,3045.74 3041.66,3033.4 2968.34,3033.4
CONTACTOR_8_COIL_POS on Top Copper "Polygon_1_Net_CONTACTOR_8_COIL_POS" (solid, remove dead copper, pour order 107): 2406,3045.74 2406,3164.06 2418.34,3176.4 2491.66,3176.4 2504,3164.06 2504,3045.74 2491.66,3033.4 2418.34,3033.4
ISONOC_2_NEGATIVE on Top Copper "Polygon_1_Net_ISONOC_2_NEGATIVE" (solid, remove dead copper, pour order 101): 3966,2709.06 3978.34,2721.4 4061.66,2721.4 4074,2709.06 4074,2635.74 4061.66,2623.4 3978.34,2623.4 3966,2635.74
ISONOC_1_NEGATIVE on Top Copper "Polygon_1_Net_ISONOC_1_NEGATIVE" (solid, remove dead copper, pour order 100): 3971,2984.06 3983.34,2996.4 4066.66,2996.4 4079,2984.06 4079,2910.74 4066.66,2898.4 3983.34,2898.4 3971,2910.74
ISONOC_0_NEGATIVE on Top Copper "Polygon_1_Net_ISONOC_0_NEGATIVE" (solid, remove dead copper, pour order 105): 3971,3259.06 3983.34,3271.4 4066.66,3271.4 4079,3259.06 4079,3185.74 4066.66,3173.4 3983.34,3173.4 3971,3185.74
ISONOC_3_NEGATIVE on Top Copper "Polygon_1_Net_ISONOC_3_NEGATIVE" (solid, remove dead copper, pour order 102): 4499,2635.74 4486.66,2623.4 4403.34,2623.4 4391,2635.74 4391,2709.06 4403.34,2721.4 4486.66,2721.4 4499,2709.06
ISONOC_5_NEGATIVE on Top Copper "Polygon_1_Net_ISONOC_5_NEGATIVE" (solid, remove dead copper, pour order 103): 4494,3185.74 4481.66,3173.4 4398.34,3173.4 4386,3185.74 4386,3259.06 4398.34,3271.4 4481.66,3271.4 4494,3259.06
NetC1303_1 on Top Copper "Polygon_2_Net_N$279" (solid, remove dead copper, pour order 92): 1123.34,3991.4 1158.34,3991.4 1161,3994.06 1161,4024.06 1168.34,4031.4 1191.66,4031.4 1199,4024.06 1199,3955.74 1191.66,3948.4 1123.34,3948.4 1116,3955.74 1116,3984.06
NetC1303_1 on Top Copper "Polygon_3_Net_N$279" (solid, remove dead copper, pour order 95): 1123.34,3991.4 1158.34,3991.4 1161,3994.06 1161,4024.06 1168.34,4031.4 1191.66,4031.4 1199,4024.06 1199,3955.74 1191.66,3948.4 1123.34,3948.4 1116,3955.74 1116,3984.06
CAN_TRANS_1_EXT_SUPPLY on Top Copper "Polygon_2_Net_CAN_TRANS_1_EXT_SUPPLY" (solid, remove dead copper, pour order 96): 468.34,3858.4 549,3858.4 549,3876.4 516.66,3876.4 504,3889.06 504,3939.06 491.66,3951.4 468.34,3951.4 456,3939.06 456,3870.74
SUPPLY_EXT_2 on Top Copper "Polygon_1_Net_SUPPLY_EXT_2" (solid, remove dead copper, pour order 122): 2382.93,3592.4 2360,3615.33 2360,3679.47 2382.93,3702.4 2647.93,3702.4 2675,3729.47 2675,3974.47 2702.93,4002.4 2852.07,4002.4 2880,3974.47 2880,3899.74 2906.81,3877.4 2951.81,3877.4 3105,3749.74 3105,3620.33 3077.07,3592.4
ISONOC_5_NEGATIVE on Top Copper "Polygon_4_Net_ISONOC_5_NEGATIVE" (solid, remove dead copper, pour order 98): 4344,3774.06 4331.66,3786.4 4258.34,3786.4 4246,3774.06 4246,3740.74 4258.34,3728.4 4331.66,3728.4 4344,3740.74
ISO_GPIO_SUPPLY on Top Copper "Polygon_1_Net_ISO_GPIO_SUPPLY" (solid, remove dead copper, pour order 93): 2194,3459.06 2194,3424.06 2196.66,3421.4 2226.66,3421.4 2234,3414.06 2234,3390.74 2226.66,3383.4 2158.34,3383.4 2151,3390.74 2151,3459.06 2158.34,3466.4 2186.66,3466.4
CONTACTOR_FEEDBACK_SUPPLY_EXT on Top Copper "Polygon_1_Net_CONTACTOR_FEEDBACK_SUPPLY_EXT" (solid, remove dead copper, pour order 99): 3311.66,3513.4 3266.66,3513.4 3264,3510.74 3264,3480.74 3256.66,3473.4 3233.34,3473.4 3226,3480.74 3226,3549.06 3233.34,3556.4 3311.66,3556.4 3319,3549.06 3319,3520.74
SUPPLY_EXT_0 on Top Copper "Polygon_3_Net_SUPPLY_EXT_0" (solid, remove dead copper, pour order 97): 3403.34,3506.4 3438.34,3506.4 3441,3509.06 3441,3539.06 3448.34,3546.4 3471.66,3546.4 3479,3539.06 3479,3465.74 3471.66,3458.4 3403.34,3458.4 3396,3465.74 3396,3499.06
SUPPLY_EXT_0 on Top Copper "Polygon_1_Net_SUPPLY_EXT_0" (solid, remove dead copper, pour order 94): 2211,3560.74 2211,3595.74 2208.34,3598.4 2178.34,3598.4 2171,3605.74 2171,3629.06 2178.34,3636.4 2246.66,3636.4 2254,3629.06 2254,3560.74 2246.66,3553.4 2218.34,3553.4
CONTACTOR_8_COIL_POS on Bot Copper "Polygon_2_Net_CONTACTOR_8_COIL_POS" (solid, remove dead copper, pour order 137): 2504,3164.06 2491.66,3176.4 2418.34,3176.4 2406,3164.06 2406,3130.74 2418.34,3118.4 2491.66,3118.4 2504,3130.74
CONTACTOR_6_COIL_POS on Bot Copper "Polygon_2_Net_CONTACTOR_6_COIL_POS" (solid, remove dead copper, pour order 139): 3054,3164.06 3041.66,3176.4 2968.34,3176.4 2956,3164.06 2956,3130.74 2968.34,3118.4 3041.66,3118.4 3054,3130.74
ISONOC_0_NEGATIVE on Bot Copper "Polygon_2_Net_ISONOC_0_NEGATIVE" (solid, remove dead copper, pour order 138): 4066.66,3173.4 4079,3185.74 4079,3259.06 4066.66,3271.4 4033.34,3271.4 4021,3259.06 4021,3185.74 4033.34,3173.4
ISONOC_0_NEGATIVE on Bot Copper "Polygon_3_Net_ISONOC_0_NEGATIVE" (solid, remove dead copper, pour order 136): 4066.66,3173.4 4079,3185.74 4079,3259.06 4066.66,3271.4 4033.34,3271.4 4021,3259.06 4021,3185.74 4033.34,3173.4
ISONOC_4_NEGATIVE on Bot Copper "Polygon_2_Net_ISONOC_4_NEGATIVE" (solid, remove dead copper, pour order 142): 4431.66,2898.4 4444,2910.74 4444,2984.06 4431.66,2996.4 4398.34,2996.4 4386,2984.06 4386,2910.74 4398.34,2898.4
ISONOC_5_NEGATIVE on Bot Copper "Polygon_3_Net_ISONOC_5_NEGATIVE" (solid, remove dead copper, pour order 135): 4344,3774.06 4331.66,3786.4 4258.34,3786.4 4246,3774.06 4246,3740.74 4258.34,3728.4 4331.66,3728.4 4344,3740.74
ISONOC_5_NEGATIVE on Bot Copper "Polygon_2_Net_ISONOC_5_NEGATIVE" (solid, remove dead copper, pour order 143): 4431.66,3173.4 4444,3185.74 4444,3259.06 4431.66,3271.4 4398.34,3271.4 4386,3259.06 4386,3185.74 4398.34,3173.4
ISONOC_3_NEGATIVE on Bot Copper "Polygon_2_Net_ISONOC_3_NEGATIVE" (solid, remove dead copper, pour order 145): 4436.66,2623.4 4449,2635.74 4449,2709.06 4436.66,2721.4 4403.34,2721.4 4391,2709.06 4391,2635.74 4403.34,2623.4
ISONOC_2_NEGATIVE on Bot Copper "Polygon_2_Net_ISONOC_2_NEGATIVE" (solid, remove dead copper, pour order 144): 4061.66,2623.4 4074,2635.74 4074,2709.06 4061.66,2721.4 4028.34,2721.4 4016,2709.06 4016,2635.74 4028.34,2623.4
ISONOC_1_NEGATIVE on Bot Copper "Polygon_2_Net_ISONOC_1_NEGATIVE" (solid, remove dead copper, pour order 141): 4066.66,2898.4 4079,2910.74 4079,2984.06 4066.66,2996.4 4033.34,2996.4 4021,2984.06 4021,2910.74 4033.34,2898.4
CONTACTOR_7_COIL_POS on Bot Copper "Polygon_2_Net_CONTACTOR_7_COIL_POS" (solid, remove dead copper, pour order 140): 2779,3164.06 2766.66,3176.4 2693.34,3176.4 2681,3164.06 2681,3130.74 2693.34,3118.4 2766.66,3118.4 2779,3130.74

## Keep-outs
Keep-Out Layer:
  the board outline again, w0

## Silkscreen, mask and mechanical layers (free items; w line width, h text height)
Top Overlay:
  drawing of 11870 lines, arcs and shapes, not listed
  text "GND" at 134,4468 h40
  text "EXT 1" at 127,4417 h40
  text "X1203" at 2375,4374.9 h50
  text "X1202" at 2800,4374.9 h50
  text "X1201" at 3225,4374.9 h50
  text "X1701" at 4440,4365 h50
  text "10" at 2105,4355 h28
  text "3" at 460,4320 h28
  text "4" at 690,4320 h28
  text "4" at 945,4320 h28
  text "6" at 1300,4320 h28
  text "6" at 1525,4320 h28
  text "3" at 2310,4320 h28
  text "4" at 2545,4320 h28
  text "3" at 2735,4320 h28
  text "3" at 3155,4320 h28
  text "4" at 3390,4320 h28
  text "7" at 3610,4320 h28
  text "12" at 4320,4320 h28
  text "4" at 2965,4315 h28
  text "7" at 4530,4315 h28
  text "12" at 5200,4262.4 h28
  text "CONT. 8" at 2385.35,4257.4 h50
  text "CONT. 7" at 2810.35,4257.4 h50
  text "CONT. 6" at 3200,4257.4 h50
  text "X2001" at 3915,4250 h50
  text "ISO NOC" at 4230,4230 h50
  text "ANALOG" at 4577.68,4230 h50
  text "RS485" at 1070,4210 h50
  text "CAN 1" at 525,4200 h50
  text "GPIO" at 1785,4200 h50
  text "LO" at 444,4117 h40
  text "HI" at 170,4115 h40
  text "CAN 1" at 297,4058 h50
  text "INTERLOCK" at 2665,3815.4 h50
  text "STATUS" at 2665,3767.4 h50
  text "STB" at 665,3345 h50
  text "EXT" at 662.5,3297.4 h50
  text "SDCARD" at 5870,2201 h50 r90
  text "SDCARD" at 5586,2198 h50 r90
  text "SPI MOSI" at 5635,2195 h50 r90
  text "SDCARD" at 5744,2195 h50 r90
  text "SPI SCK" at 5791,2195 h50 r90
  text "SPI MISO" at 5920,2195 h50 r90
  text "ADC CH 1" at 4910,2190 h50 r90
  text "SDCARD" at 5445,2190 h50 r90
  text "SPI NSS" at 5490,2188 h50 r90
  text "CAN 1 TX" at 347.19,2182.03 h50 r90
  text "RS485 TX" at 1015,2180.6 h50 r90
  text "ADC CH 0" at 4810,2180 h50 r90
  text "ADC CH 2" at 5010,2180 h50 r90
  text "ADC CH 3" at 5115,2180 h50 r90
  text "ADC CH 4" at 5215,2180 h50 r90
  text "SDCARD" at 5295,2180 h50 r90
  text "SUP CRTL" at 5340,2180 h50 r90
  text "RS485 DE" at 1240,2177.78 h50 r90
  text "CAN 1 RX" at 442.19,2177.09 h50 r90
  text "RS485 RX" at 1350,2175.66 h50 r90
  text "CONTROL" at 2535,2166 h50 r90
  text "CONTROL" at 2815,2166 h50 r90
  text "CONTROL" at 3085,2166 h50 r90
  text "CONTROL" at 3445,2166 h50 r90
  text "CONTROL" at 3595,2166 h50 r90
  text "CAN 1 STB" at 605,2151.91 h50 r90
  text "RS485 NRE" at 1125,2145.53 h50 r90
  text "FEEDBACK" at 3295,2138.6 h50 r90
  text "ISO GPIO IN 1" at 1740,2098.22 h50 r90
  text "ISO GPIO IN 0" at 1840,2093.14 h50 r90
  text "ISO GPIO IN 3" at 2190,2092.87 h50 r90
  text "ISO GPIO IN 2" at 2290,2093.19 h50 r90
  text "CONTACTOR 8" at 2485,2064.87 h50 r90
  text "CONTACTOR 7" at 2765,2064.87 h50 r90
  text "CONTACTOR 8" at 3245,2064.87 h50 r90
  text "CONTACTOR 7" at 3395,2064.87 h50 r90
  text "CONTACTOR 6" at 3035,2064.45 h50 r90
  text "CONTACTOR 6" at 3545,2064.45 h50 r90
  text "ISO GPIO OUT 1" at 1540,2048.61 h50 r90
  text "ISO GPIO OUT 0" at 1645,2043.52 h50 r90
  text "ISO GPIO OUT 2" at 2090,2043.57 h50 r90
  text "ISO GPIO OUT 3" at 1990,2043.25 h50 r90
  text "+3.3V 0" at 5793,1780 h50
  text "CONTROL" at 3977,1408 h50 r90
  text "ISONOC 0" at 3922.19,1406 h50 r90
  text "ISONOC 1" at 4057.19,1406 h50 r90
  text "CONTROL" at 4112,1406 h50 r90
  text "ISONOC 2" at 4196,1406 h50 r90
  text "ISONOC 4" at 4458,1406 h50 r90
  text "ISONOC 3" at 4325,1405 h50 r90
  text "CONTROL" at 4517,1405 h50 r90
  text "ISONOC 5" at 4594,1405 h50 r90
  text "CONTROL" at 4646,1405 h50 r90
  text "CONTROL" at 4386,1404 h50 r90
  text "CONTROL" at 4247,1403 h50 r90
  text "GND 0" at 5805,1390 h50
  text "foxBMS BMS-Extension v'.GlobalVersion'" at 3433,298 h60
  text "Creative Commons / Attribution 4.0" at 6087,284 h50 r90
  text "GND" at 370,272.4 h40 r90
  text "GND" at 470,272.4 h40 r90
  text "GND" at 2140,272.4 h40 r90
  text "GND" at 2245,272.4 h40 r90
  text "1" at 3300,90 h28
  text "1" at 270,82.4 h40
  text "foxBMS.org" at 5424,76 h120
  text "+3.3V" at 385,20 h40
  text "+3.3V" at 2160,20 h40
Bottom Overlay:
  drawing of 10217 lines, arcs and shapes, not listed
Mechanical 1:
  the board outline again, w0

## Text inside footprints (layer, text, board x,y; h text height)
Designator24: Top Copper "1" at 5939,407 h20 r90; Bot Copper "4" at 5939,566 h20 r90; Supply "2" at 5939,453 h20 r90; GND "3" at 5939,503 h20 r90